# Altium PCB Smart-Switch-v1.1.PcbDoc (part 2 of 3)
Units mil, origin at the board's own origin, x right, y up, seen from the top; angles counter-clockwise.
Board outline 1456.69 x 1377.95 mil, 4 copper layers (Top Layer, Power Layer, Ground Layer, Bottom Layer), stack 39.334 mil thick; 77 components, 44 nets, 240 pads, 216 vias.
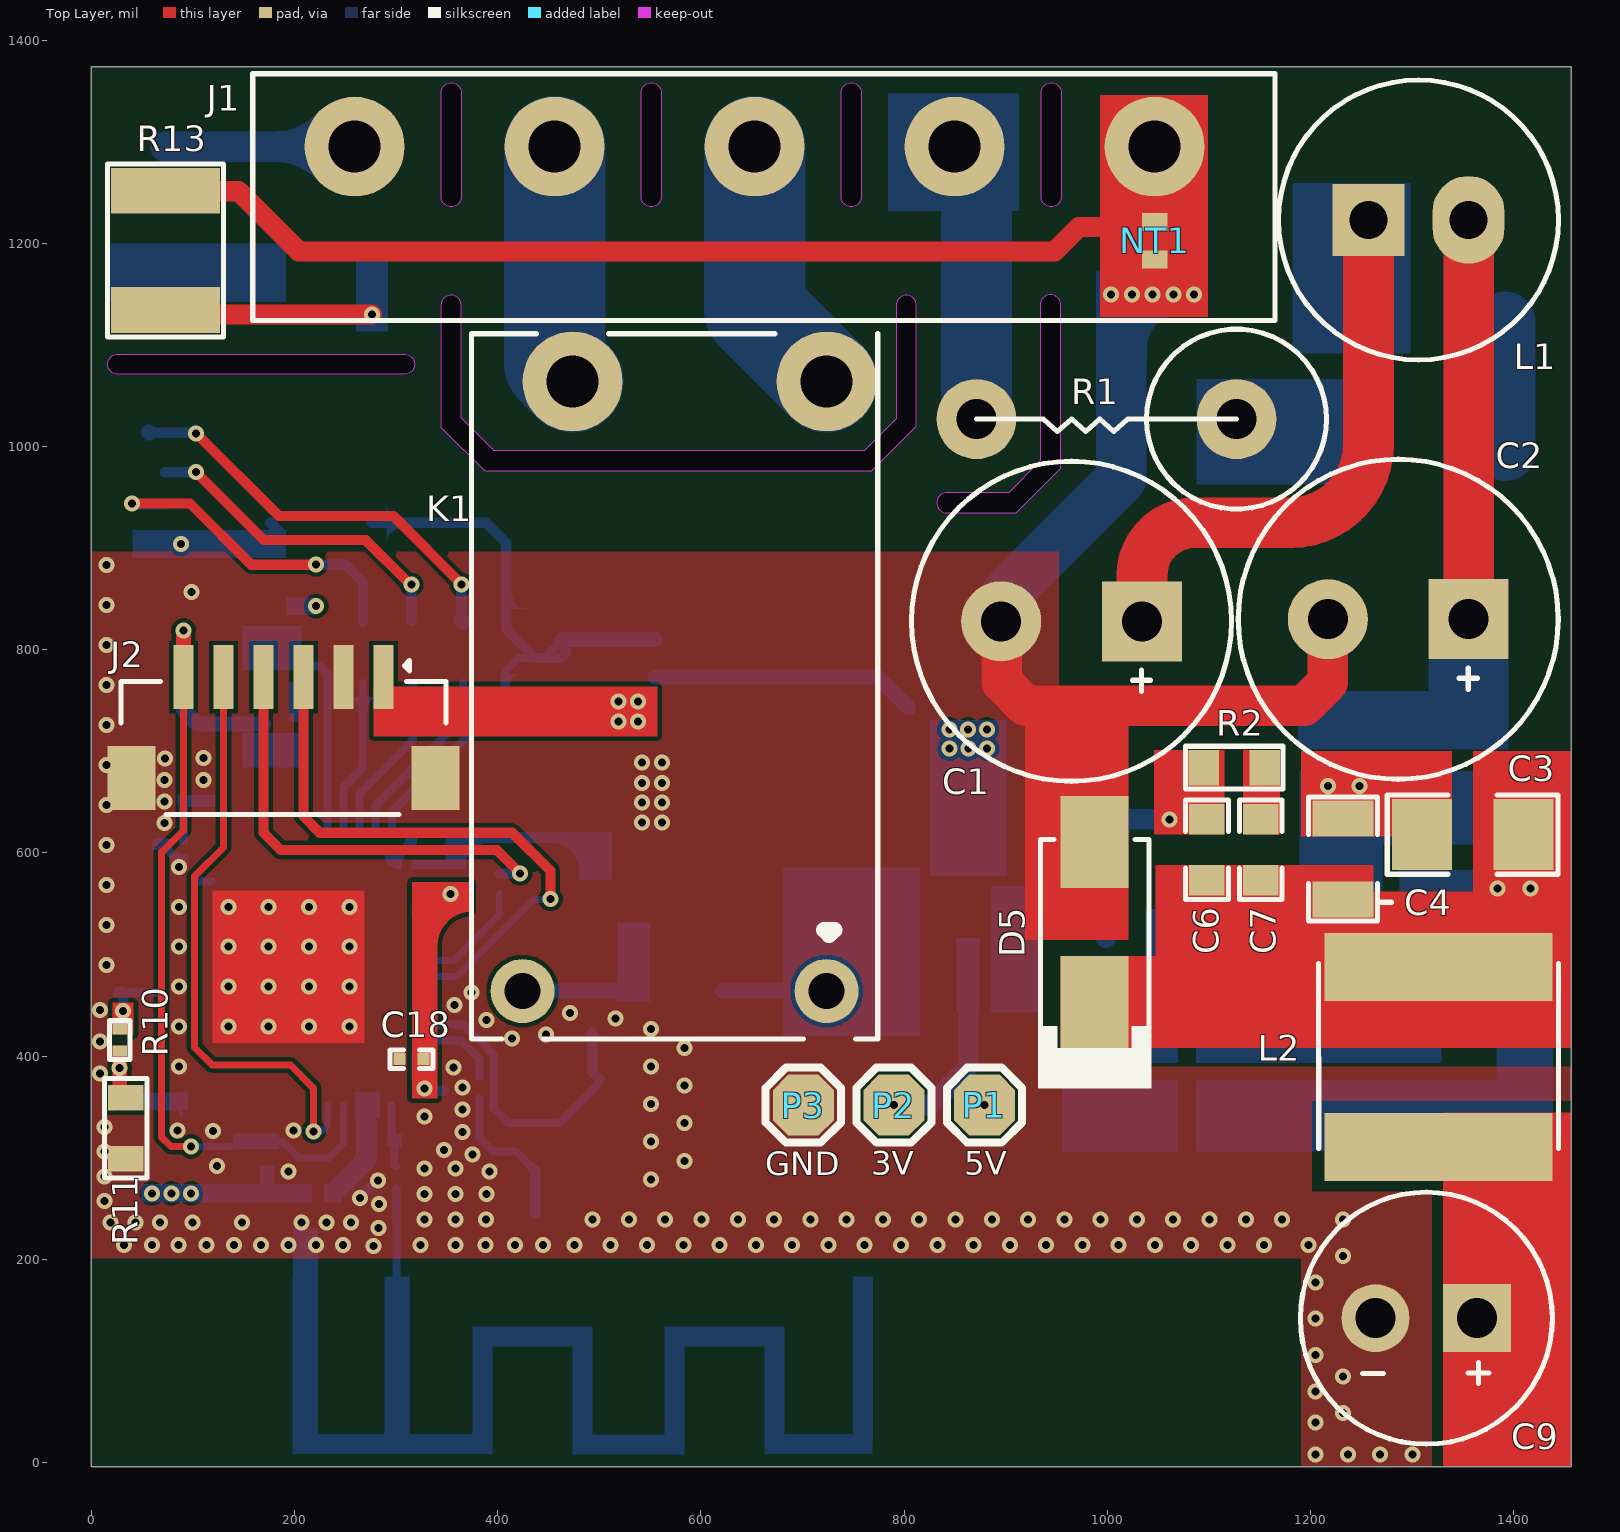
[diagram p0: Top Layer view]

## Part data (continued)
L3: library part MLG0603P2N0CT000, "FIXED IND 2NH 600MA 100 MOHM SMD", Case Code (Imperial)=0201, Case Code (Metric)=0603, Current Rating=600mA, DC Resistance (DCR)=100mR, LCSC Part Number=C531323, Manufacturer=TDK, Max Operating Temperature=125°C, Min Operating Temperature=-55°C, Package Quantity=15000, Self Resonant Frequency=8.5GHz, Supplier Part Number=445-172431-1-ND, Test Frequency=500MHz, Case/Package=0201, Category="Fixed Inductors", ComponentLink1Description=https://datasheet.ciiva.com/41860/inductor-commercial-high-frequency-mlg-qp-en-41860968.pdf?src-supplier=Digi-Key, ComponentLink1URL=https://datasheet.ciiva.com/41860/inductor-commercial-high-frequency-mlg-qp-en-41860968.pdf?src-supplier=Digi-Key, Core Material=Non-Magnetic, Height - Seated (Max)=0.013inch, Item Type=Inductor, Length=0.024inch, Manufacturer Part Number=MLG0603P2N0CT000, Mounting Technology="Surface Mount", Packaging="Cut Tape", Pricing="1=0.13, 10=0.118, 25=0.1, 50=0.0882, 100=0.0808, 250=0.07352, 500=0.06908, 1000=0.05292, 2500=0.04998 (USD)", RoHS=Yes, RoHS Compliant=Yes, Series=MLG-P, Shielding=Unshielded, Stock=23499, Supplier=Digi-Key, Width=0.012inch
L4: library part LQP03HQ1N6B02D, "FIXED IND 1.6NH 1A 50 MOHM SMD", Case Code (Imperial)=0201, Case Code (Metric)=0603, Current Rating=1A, DC Resistance (DCR)=50mR, LCSC Part Number=C237384, Manufacturer=Murata, Max Operating Temperature=125°C, Min Operating Temperature=-55°C, Self Resonant Frequency=10GHz, Supplier Part Number=490-13883-1-ND, Test Frequency=500MHz, Case/Package=0201, Category="Fixed Inductors", ComponentLink1Description=http://search.murata.co.jp/Ceramy/image/img/P02/JELF243C-0021.pdf?src-supplier=Digi-Key, ComponentLink1URL=http://search.murata.co.jp/Ceramy/image/img/P02/JELF243C-0021.pdf?src-supplier=Digi-Key, Core Material=Non-Magnetic, Item Type=Inductor, Manufacturer Part Number=LQP03HQ1N6B02D, Mounting Technology="Surface Mount", Packaging="Cut Tape", Pricing="1=0.16, 10=0.145, 25=0.1236, 50=0.109, 100=0.1, 250=0.09088, 500=0.08544, 1000=0.06545, 2500=0.06181 (USD)", RoHS=Yes, RoHS Compliant=Yes, Series=LQP03, Shielding=Unshielded, Stock=27606, Supplier=Digi-Key
L5: library part LQP03TN24NH02D, "140mA 24nH ±3% 2.3Ω 0201 Inductors (SMD) ROHS", Case Code (Imperial)=0201, Case Code (Metric)=0603, Current Rating=140mA, DC Resistance (DCR)=2.3R, LCSC Part Number=C206441, Manufacturer=Murata, Max Operating Temperature=125°C, Min Operating Temperature=-55°C, Package Quantity=15000, Self Resonant Frequency=2GHz, Supplier Part Number=490-13004-1-ND, Test Frequency=500MHz, Tolerance=3%, Case/Package=0201, Category="Fixed Inductors", ComponentLink1Description=https://datasheet.ciiva.com/29692/s0084e-29692461.pdf?src-supplier=Digi-Key, ComponentLink1URL=https://datasheet.ciiva.com/29692/s0084e-29692461.pdf?src-supplier=Digi-Key, Core Material=Non-Magnetic, DC Current=140mA, Depth=0.33mm, Height - Seated (Max)=0.013inch, Item Type=Inductor, Length=0.024inch, Manufacturer Part Number=LQP03TN24NH02D, Military Standard=Not, Mounting Technology="Surface Mount", Packaging="Tape and Reel", Pricing="1=0.1, 10=0.041, 25=0.0364, 50=0.031, 100=0.0273, 250=0.025, 500=0.02272, 1000=0.01909, 2500=0.01636 (USD)", RoHS=Yes, RoHS Compliant=Yes, Series=LQP03TN_02, Shielding=Unshielded, Stock=40849, Supplier=Digi-Key, Technology="THIN FILM", Width=0.012inch
LED1: "Colorless transparence Side stickers -40℃~+85℃ Common anode RGB 120° 60mW SMD,1.5x3.2mm Light Emitting Diodes (LED) ROHS", LCSC Part Number=C496820, Manufacturer=MEIHUA, Package=SMD,1.5x3.2mm, ComponentLink1Description=LCSC, ComponentLink1URL=https://www.lcsc.com/product-detail/Light-Emitting-Diodes-LED_MEIHUA-MHS110FRGBCT_C496820.html, Item Type="RGB LED", Manufacturer Part Number=MHS110FRGBCT
NT1: "Net Tie SMD", Manufacturer Part Number="Net Tie", Item Type="Net Tie Pad"
P1 P2 P3: "Test Point ON", Item Type="TEST POINT"
Q1: "MOSFET N-CH 130V 1A SOT23", LCSC Part Number=C156273, Manufacturer="Diodes Incorporated", Package=SOT-23-3L, ComponentLink1Description=LCSC, ComponentLink1URL=https://www.lcsc.com/product-detail/MOSFETs_Diodes-Incorporated-DMN13H750S-7_C156273.html, Item Type=Mosfet, Manufacturer Part Number=DMN13H750S-7
R1: library part "Vertical Resistor", "Metal Oxide Resistors 10Ω 2W ±350ppm/℃ ±5% Plugin Through Hole Resistors ROHS", LCSC Part Number=C601001, Manufacturer=VO, Manufacturer Part Number=MO2WS-10Ω±5%-6T63, Package=Plugin, ComponentLink1Description=LCSC, ComponentLink1URL=https://www.lcsc.com/product-detail/Through-Hole-Resistors_VO-MO2WS-10-5-6T63_C601001.html, Item Type="Through Hole Resistor"
R2: library part CRGCQ0603F220K, "RES 220K OHM 1% 1/10W 0603", LCSC Part Number=C4282892, Manufacturer="TE Connectivity", Power Rating=100mW, Supplier Part Number=73AC9080, Voltage Rating=75V, Category="Chip SMD Resistors", ComponentLink1Description=http://datasheet.octopart.com/CRGCQ0603F220K-TE-Connectivity-datasheet-114679081.pdf?src-supplier=Newark, ComponentLink1URL=http://datasheet.octopart.com/CRGCQ0603F220K-TE-Connectivity-datasheet-114679081.pdf?src-supplier=Newark, ComponentLink2Description=http://datasheet.octopart.com/CRGCQ0603F220K-TE-Connectivity-datasheet-114679081.pdf?src-supplier=Verical, ComponentLink2URL=http://datasheet.octopart.com/CRGCQ0603F220K-TE-Connectivity-datasheet-114679081.pdf?src-supplier=Verical, ComponentLink3Description=http://datasheet.octopart.com/CRGCQ0603F220K-TE-Connectivity-datasheet-114679081.pdf?src-supplier=Digi-Key, ComponentLink3URL=http://datasheet.octopart.com/CRGCQ0603F220K-TE-Connectivity-datasheet-114679081.pdf?src-supplier=Digi-Key, ComponentLink4Description=https://www.te.com/commerce/DocumentDelivery/DDEController?Action=srchrtrv&amp;DocNm=1773204-3&amp;DocType=DS&amp;DocLang=English&src-supplier=Digi-Key, ComponentLink4URL=https://www.te.com/commerce/DocumentDelivery/DDEController?Action=srchrtrv&amp;DocNm=1773204-3&amp;DocType=DS&amp;DocLang=English&src-supplier=Digi-Key, ComponentLink5Description=http://datasheet.octopart.com/CRGCQ0603F220K-TE-Connectivity-datasheet-114679081.pdf?src-supplier=Avnet, ComponentLink5URL=http://datasheet.octopart.com/CRGCQ0603F220K-TE-Connectivity-datasheet-114679081.pdf?src-supplier=Avnet, ComponentLink6Description=https://4donline.ihs.com/images/VipMasterIC/IC/TYEL/TYEL-S-A0004929575/TYEL-S-A0004929575-1.pdf?hkey=52A5661711E402568146F3353EA87419&src-supplier=Farnell, ComponentLink6URL=https://4donline.ihs.com/images/VipMasterIC/IC/TYEL/TYEL-S-A0004929575/TYEL-S-A0004929575-1.pdf?hkey=52A5661711E402568146F3353EA87419&src-supplier=Farnell, ComponentLink7Description=http://datasheet.octopart.com/CRGCQ0603F220K-TE-Connectivity-datasheet-114679081.pdf?src-supplier=Mouser, ComponentLink7URL=http://datasheet.octopart.com/CRGCQ0603F220K-TE-Connectivity-datasheet-114679081.pdf?src-supplier=Mouser, ComponentLink8Description=https://4donline.ihs.com/images/VipMasterIC/IC/TYEL/TYEL-S-A0004929575/TYEL-S-A0004929575-1.pdf?hkey=52A5661711E402568146F3353EA87419&src-supplier=Newark, ComponentLink8URL=https://4donline.ihs.com/images/VipMasterIC/IC/TYEL/TYEL-S-A0004929575/TYEL-S-A0004929575-1.pdf?hkey=52A5661711E402568146F3353EA87419&src-supplier=Newark, ComponentLink9Description=https://datasheet.octopart.com/5-2176339-3-TE-Connectivity-datasheet-167977702.pdf?src-supplier=Future+Electronics, ComponentLink9URL=https://datasheet.octopart.com/5-2176339-3-TE-Connectivity-datasheet-167977702.pdf?src-supplier=Future+Electronics, ComponentLink10Description=http://datasheet.octopart.com/CRGCQ0603F220K-TE-Connectivity-datasheet-114679081.pdf?src-supplier=Onlinecomponents.com, ComponentLink10URL=http://datasheet.octopart.com/CRGCQ0603F220K-TE-Connectivity-datasheet-114679081.pdf?src-supplier=Onlinecomponents.com, ComponentLink11Description=https://datasheet.octopart.com/CRGCQ0603F220K-TE-Connectivity-datasheet-114679081.pdf?src-supplier=Master+Electronics, ComponentLink11URL=https://datasheet.octopart.com/CRGCQ0603F220K-TE-Connectivity-datasheet-114679081.pdf?src-supplier=Master+Electronics, ComponentLink12Description=http://datasheet.octopart.com/CRGCQ0603F220K-TE-Connectivity-datasheet-114679081.pdf?src-supplier=TME, ComponentLink12URL=http://datasheet.octopart.com/CRGCQ0603F220K-TE-Connectivity-datasheet-114679081.pdf?src-supplier=TME, ComponentLink13Description=http://datasheet.octopart.com/CRGCQ0603F220K-TE-Connectivity-datasheet-114679081.pdf?src-supplier=Sager+Electronics, ComponentLink13URL=http://datasheet.octopart.com/CRGCQ0603F220K-TE-Connectivity-datasheet-114679081.pdf?src-supplier=Sager+Electronics, ComponentLink14Description=http://datasheet.octopart.com/CRGCQ0603F220K-TE-Connectivity-datasheet-114679081.pdf?src-supplier=Heilind+Electronics, ComponentLink14URL=http://datasheet.octopart.com/CRGCQ0603F220K-TE-Connectivity-datasheet-114679081.pdf?src-supplier=Heilind+Electronics, ComponentLink15Description=http://datasheet.octopart.com/CRGCQ0603F220K-TE-Connectivity-datasheet-114679081.pdf?src-supplier=Electro+Sonic, ComponentLink15URL=http://datasheet.octopart.com/CRGCQ0603F220K-TE-Connectivity-datasheet-114679081.pdf?src-supplier=Electro+Sonic, ComponentLink16Description=http://datasheet.octopart.com/CRGCQ0603F220K-TE-Connectivity-datasheet-114679081.pdf?src-supplier=Interstate+Connecting+Components, ComponentLink16URL=http://datasheet.octopart.com/CRGCQ0603F220K-TE-Connectivity-datasheet-114679081.pdf?src-supplier=Interstate+Connecting+Components, Height=550um, Item Type=Resistor, Manufacturer Part Number=CRGCQ0603F220K, Pricing="1=0.006 (USD)", RoHS=Yes, Stock=4740, Supplier=Avnet, Voltage Rating (DC)=75V
R3 R4: library part CRCW120622K0FKEAC, "RES 22K OHM 1% 1/4W 1206", LCSC Part Number=C1511874, Manufacturer=Vishay, Supplier Part Number=71-CRCW120622K0FKEAC, Category="Chip SMD Resistors", Item Type=Resistor, Manufacturer Part Number=CRCW120622K0FKEAC, Pricing="1=0.1, 10=0.036, 50=0.036, 100=0.016, 1000=0.011, 10000=0.007 (USD)", RoHS=Yes, RoHS Compliant=Yes, Stock=118020, Supplier=Mouser
R5: library part AC0603FR-0756KL, "RES SMD 56K OHM 1% 1/10W 0603", LCSC Part Number=C144647, Manufacturer=Yageo, Supplier Part Number=4073924, Category="Chip SMD Resistors", ComponentLink1Description=http://www.mouser.com/ds/2/447/yageodocoutput-1111992.pdf?src-supplier=Mouser, ComponentLink1URL=http://www.mouser.com/ds/2/447/yageodocoutput-1111992.pdf?src-supplier=Mouser, ComponentLink2Description=http://www.yageo.com/NewPortal/yageodocoutput?fileName=/pdf/R-Chip/PYu-AC_51_RoHS_L_6.pdf&src-supplier=Digi-Key, ComponentLink2URL=http://www.yageo.com/NewPortal/yageodocoutput?fileName=/pdf/R-Chip/PYu-AC_51_RoHS_L_6.pdf&src-supplier=Digi-Key, ComponentLink3Description=https://datasheet.octopart.com/AC0603FR-0756KL-Yageo-datasheet-151884373.pdf?src-supplier=Future+Electronics, ComponentLink3URL=https://datasheet.octopart.com/AC0603FR-0756KL-Yageo-datasheet-151884373.pdf?src-supplier=Future+Electronics, Item Type=Resistor, Manufacturer Part Number=AC0603FR-0756KL, Pricing="5000=0.0016, 25000=0.0015, 150000=0.0014, 500000=0.0014, 1500000=0.0013 (USD)", RoHS=Yes, Stock=100000, Supplier="Future Electronics"
R6: library part CRCW08055K60FKEA, "RES SMD 5.6K OHM 1% 1/8W 0805", Case Code (Imperial)=0805, Case Code (Metric)=2012, LCSC Part Number=C844634, Manufacturer=Vishay, Max Operating Temperature=155°C, Max Power Dissipation=125mW, Min Operating Temperature=-55°C, Package Quantity=5000, Ratings=AEC-Q200, Resistance Tolerance=1%, Resistor Type="Thick Film", Supplier Part Number=6791572P, Temperature Coefficient=100ppm/°C, Voltage Rating=150V, Case/Package=0805, Category="Chip SMD Resistors", ComponentLink1Description=https://datasheet.ciiva.com/11811/0900766b80d98b26-11811062.pdf?src-supplier=Rs, ComponentLink1URL=https://datasheet.ciiva.com/11811/0900766b80d98b26-11811062.pdf?src-supplier=Rs, ComponentLink2Description=https://datasheet.ciiva.com/2525/dcrcwe3-2525722.pdf?src-supplier=Digi-Key, ComponentLink2URL=https://datasheet.ciiva.com/2525/dcrcwe3-2525722.pdf?src-supplier=Digi-Key, ComponentLink3Description=https://datasheet.ciiva.com/16767/70201119-16767127.pdf?src-supplier=Allied+Electronics, ComponentLink3URL=https://datasheet.ciiva.com/16767/70201119-16767127.pdf?src-supplier=Allied+Electronics, ComponentLink4Description=https://datasheet.ciiva.com/7841/1697337-7841861.pdf?src-supplier=Element14, ComponentLink4URL=https://datasheet.ciiva.com/7841/1697337-7841861.pdf?src-supplier=Element14, ComponentLink5Description=https://datasheet.ciiva.com/26317/fld-crcw-e3-data-en-26317147.pdf?src-supplier=Distrelec, ComponentLink5URL=https://datasheet.ciiva.com/26317/fld-crcw-e3-data-en-26317147.pdf?src-supplier=Distrelec, ComponentLink6Description=https://datasheet.ciiva.com/7841/1697337-7841690.pdf?src-supplier=Element14, ComponentLink6URL=https://datasheet.ciiva.com/7841/1697337-7841690.pdf?src-supplier=Element14, ComponentLink7Description=https://datasheet.ciiva.com/22683/1847332-22683327.pdf?src-supplier=Element14, ComponentLink7URL=https://datasheet.ciiva.com/22683/1847332-22683327.pdf?src-supplier=Element14, ComponentLink8Description=https://datasheet.ciiva.com/2525/dcrcwe3-2525723.pdf?src-supplier=Digi-Key, ComponentLink8URL=https://datasheet.ciiva.com/2525/dcrcwe3-2525723.pdf?src-supplier=Digi-Key, ComponentLink9Description=https://datasheet.ciiva.com/2525/dcrcwe3-2525724.pdf?src-supplier=Digi-Key, ComponentLink9URL=https://datasheet.ciiva.com/2525/dcrcwe3-2525724.pdf?src-supplier=Digi-Key, ComponentLink10Description=https://datasheet.ciiva.com/9065/dcrcwe3-9065422.pdf?src-supplier=Avnet, ComponentLink10URL=https://datasheet.ciiva.com/9065/dcrcwe3-9065422.pdf?src-supplier=Avnet, Contact Plating=Tin, Depth=1.25mm, Features="Automotive AEC-Q200", Height=0.45mm, Item Type=Resistor, Length=2mm, Manufacturer Part Number=CRCW08055K60FKEA, Number of Terminations=2, Packaging="Tape and Reel", Pins=2, Power Rating=125mW, Pricing="1250=0.024, 2500=0.013, 4000=0.015, 5000=0.011 (GBP)", Reach SVHC Compliant=Unknown, RoHS=Yes, RoHS Compliant=Yes, Series=CRCW, Stock=100250, Supplier=Rs, Technology="THICK FILM", Termination=SMD/SMT, Tolerance=1%, Voltage Rating (DC)=150V, Weight=0.000194oz, Width=1.25mm
R7 R10 R14 R15: library part RC0201FR-0710KL, "RES SMD 10K OHM 1% 1/20W 0201", LCSC Part Number=C106225, Manufacturer=Yageo, Package=0201, ComponentLink7Description=LCSC, ComponentLink7URL=https://www.lcsc.com/product-detail/Chip-Resistor-Surface-Mount_YAGEO-RC0201FR-0710KL_C106225.html, Item Type=Resistor, Manufacturer Part Number=RC0201FR-0710KL
R8: library part RC0201FR-07499RL, "RES 499 OHM 1% 1/20W 0201", Case Code (Imperial)=0201, Case Code (Metric)=0603, LCSC Part Number=C138137, Manufacturer=Yageo, Max Operating Temperature=125°C, Max Power Dissipation=50mW, Min Operating Temperature=-55°C, Resistor Type="Thick Film", Temperature Coefficient=200ppm/°C, Tolerance=1%, Case/Package=0201, Category="Chip SMD Resistors", ComponentLink1Description=http://www.yageo.com/documents/recent/PYu-RC_Group_51_RoHS_L_10.pdf?src-supplier=Digi-Key, ComponentLink1URL=http://www.yageo.com/documents/recent/PYu-RC_Group_51_RoHS_L_10.pdf?src-supplier=Digi-Key, ComponentLink2Description=http://www.yageo.com/documents/recent/PYu-RC_Group_51_RoHS_L_9.pdf?src-supplier=Digi-Key, ComponentLink2URL=http://www.yageo.com/documents/recent/PYu-RC_Group_51_RoHS_L_9.pdf?src-supplier=Digi-Key, Depth=0.3mm, Features="Moisture Resistant", Height=0.01inch, Item Type=Resistor, Lead Free="Lead Free", Length=0.024inch, Manufacturer Part Number=RC0201FR-07499RL, Military Standard=Not, Number of Terminations=2, Packaging="Tape and Reel", Pricing 1="10000=0.00128 (USD)", Resistance=499R, RoHS=Yes, RoHS Compliant=Yes, Stock 1=150000, Supplier 1=Avnet, Supplier Part Number 1=RC0201FR-07499RL, Width=0.012inch
R9: library part RC0402FR-071KL, "RES 1K OHM 1% 1/16W 0402", Case Code (Imperial)=0402, Case Code (Metric)=1005, LCSC Part Number=C106235, Manufacturer=Yageo, Max Operating Temperature=155°C, Max Power Dissipation=63mW, Min Operating Temperature=-55°C, Power Rating=62.5mW, Resistance=1kR, Resistance Tolerance=1%, Resistor Type="Thick Film", Temperature Coefficient=100ppm/°C, Voltage Rating=50V, Case/Package=0402, Category="Chip SMD Resistors", ComponentLink1Description=https://datasheet.ciiva.com/11819/0900766b80c66297-11819477.pdf?src-supplier=RSComponents, ComponentLink1URL=https://datasheet.ciiva.com/11819/0900766b80c66297-11819477.pdf?src-supplier=RSComponents, ComponentLink2Description=https://datasheet.ciiva.com/7983/1018594-7983502.pdf?src-supplier=Element14, ComponentLink2URL=https://datasheet.ciiva.com/7983/1018594-7983502.pdf?src-supplier=Element14, ComponentLink3Description=https://datasheet.ciiva.com/22747/1018594-22747513.pdf?src-supplier=Element14, ComponentLink3URL=https://datasheet.ciiva.com/22747/1018594-22747513.pdf?src-supplier=Element14, ComponentLink4Description=https://datasheet.ciiva.com/12666/pyu-rc0402-51-rohs-l-6-r-12666741.pdf?src-supplier=Mouser, ComponentLink4URL=https://datasheet.ciiva.com/12666/pyu-rc0402-51-rohs-l-6-r-12666741.pdf?src-supplier=Mouser, ComponentLink5Description=https://datasheet.ciiva.com/7849/1018594-7849869.pdf?src-supplier=Element14, ComponentLink5URL=https://datasheet.ciiva.com/7849/1018594-7849869.pdf?src-supplier=Element14, ComponentLink6Description=https://datasheet.ciiva.com/7849/1018594-7849871.pdf?src-supplier=Element14, ComponentLink6URL=https://datasheet.ciiva.com/7849/1018594-7849871.pdf?src-supplier=Element14, ComponentLink7Description=https://datasheet.ciiva.com/17063/pyu-rc0402-51-rohs-l-6-r-17063193.pdf?src-supplier=Future+Electronics, ComponentLink7URL=https://datasheet.ciiva.com/17063/pyu-rc0402-51-rohs-l-6-r-17063193.pdf?src-supplier=Future+Electronics, Construction=Rectangular, Depth=0.5mm, Features="Moisture Resistant", Height=0.32mm, Item Type=Resistor, Lead Free="Lead Free", Length=1mm, Manufacturer Part Number=RC0402FR-071KL, Military Standard=Not, Number of Pins=2, Number of Terminations=2, Packaging="Tape and Reel", Pricing 1="10000=0.00085, 20000=0.00087, 40000=0.00084, 60000=0.00083, 80000=0.00079, 100000=0.00078, 1000000=0.00076 (USD)", Reach SVHC Compliant=Yes, RoHS=Yes, RoHS Compliant=Yes, Series=RC, Size Code=0402, Stock 1=13030000, Supplier 1=Avnet, Supplier Part Number 1=RC0402FR-071KL, Technology="THICK FILM", Termination=SMD/SMT, Tolerance=1%, Voltage Rating (DC)=50V, Width=0.5mm
R11: library part B57332V5103F360, "THERMISTOR NTC 10KOHM 3380K 0603", Case Code (Imperial)=0603, Case Code (Metric)=1608, LCSC Part Number=C209893, Manufacturer="TDK EPCOS", Max Operating Temperature=150°C, Max Power Dissipation=180mW, Min Operating Temperature=-40°C, Package Quantity=4000, Resistance Tolerance=1%, Supplier Part Number=8807288P, Case/Package=0603, Category=Thermistors, ComponentLink1Description=https://datasheet.ciiva.com/26930/getdatasheetpartid-777571-26930642.pdf?src-supplier=Verical, ComponentLink1URL=https://datasheet.ciiva.com/26930/getdatasheetpartid-777571-26930642.pdf?src-supplier=Verical, ComponentLink2Description=https://datasheet.ciiva.com/46435/1835850-46435735.pdf?src-supplier=Element14, ComponentLink2URL=https://datasheet.ciiva.com/46435/1835850-46435735.pdf?src-supplier=Element14, Contact Plating=Tin, Depth=0.8mm, Height=0.9mm, Item Type="NTC Thermistor", Length=1.6mm, Manufacturer Part Number=B57332V5103F360, Mounting Technology="Surface Mount", Packaging="Tape and Reel", Pins=2, Power Rating=180mW, Pricing="250=0.085 (GBP)", Radiation Hardening=No, Reach SVHC Compliant=No, RoHS=Yes, RoHS Compliant=Yes, Series=B573, Stock=178550, Supplier=Rs, Termination=SMD/SMT, Tolerance=1%, Width=0.8mm
R12 R13: library part CR1210J30204G, "750mW Thick Film Resistors ±5% ±200ppm/℃ 200kΩ 1210 Chip Resistor - Surface Mount ROHS", LCSC Part Number=C102430, Manufacturer="LIZ Elec", Package=1210, ComponentLink1Description=LCSC, ComponentLink1URL=https://www.lcsc.com/product-detail/Chip-Resistor-Surface-Mount_LIZ-Elec-CR1210J30204G_C102430.html, Item Type=Resistor, Manufacturer Part Number=CR1210J30204G
R16: library part RT0603BRD07240RL, "RES SMD 240 OHM 0.1% 1/10W 0603", Case Code (Imperial)=0603, Case Code (Metric)=1608, LCSC Part Number=C705750, Manufacturer=Yageo, Max Operating Temperature=125°C, Max Power Dissipation=100mW, Min Operating Temperature=-55°C, Resistor Type="Thin Film", Temperature Coefficient=25ppm/°C, Tolerance=0.1%, Voltage Rating=75V, Voltage Rating (DC)=50V, Case/Package=0603, Category="Chip SMD Resistors", ComponentLink1Description=https://datasheet.ciiva.com/8886/pyu-rt-1-to-0-05-rohs-l-4-8886602.pdf?src-supplier=Avnet, ComponentLink1URL=https://datasheet.ciiva.com/8886/pyu-rt-1-to-0-05-rohs-l-4-8886602.pdf?src-supplier=Avnet, ComponentLink2Description=https://datasheet.ciiva.com/12799/pyu-rt-1-to-0-05-rohs-l-4-12799039.pdf?src-supplier=Mouser, ComponentLink2URL=https://datasheet.ciiva.com/12799/pyu-rt-1-to-0-05-rohs-l-4-12799039.pdf?src-supplier=Mouser, Construction=Rectangular, Contact Plating=Tin,Matte, Depth=0.8mm, Features="Moisture Resistant", Height=0.022inch, Lead Free="Lead Free", Length=1.6mm, Manufacturer Part Number=RT0603BRD07240RL, Military Standard=Not, Number of Terminations=2, Packaging="Tape and Reel", Power Rating=100mW, Pricing 1="1=0.13940 (USD)", Radiation Hardening=No, Resistance=240R, RoHS=Yes, RoHS Compliant=Yes, Series=RT, Stock 1=5, Supplier 1="Arrow Electronics", Supplier Part Number 1=RT0603BRD07240RL, Termination=SMD/SMT, Width=0.031inch
R17 R18: library part RCA0603100RFKEAHP, "RES SMD 100 OHM 1% 1/4W 0603", Case Code (Imperial)=0603, Case Code (Metric)=1608, LCSC Part Number=C2074203, Manufacturer="Vishay Dale", Max Operating Temperature=155°C, Max Power Dissipation=250mW, Min Operating Temperature=-55°C, Resistor Type="Thick Film", Supplier Part Number 1=541-3244-2-ND, Temperature Coefficient=100ppm/°C, Tolerance=1%, Case/Package=0603, ComponentLink1Description=http://www.vishay.com/docs/20067/rcahp.pdf?src-supplier=Digi-Key, ComponentLink1URL=http://www.vishay.com/docs/20067/rcahp.pdf?src-supplier=Digi-Key, Features="Automotive AEC-Q200,Anti-Sulfur", Manufacturer Part Number=RCA0603100RFKEAHP, Number of Terminations=2, Packaging="Tape and Reel", Resistance=100R, RoHS Compliant=Yes, Stock 1=0, Supplier 1=Digi-Key
SW1 SW2: "SWITCH TACTILE SPST-NO 0.05A 12V", Contact Current Rating=50mA, Contact Resistance=100mR, Insulation Resistance=100MR, LCSC Part Number=C231329, Manufacturer=Omron, Max Operating Temperature=70°C, Max Voltage Rating (DC)=12V, Min Operating Temperature=-25°C, Operating Force=1.5N, Package Quantity=1, Ratings="Dust Proof,IP40", Supplier Part Number 1=SW1020DKR-ND, Actuator Length=0.4mm, Actuator Type=Standard, ComponentLink1Description=http://www.farnell.com/datasheets/60838.pdf?src-supplier=Farnell, ComponentLink1URL=http://www.farnell.com/datasheets/60838.pdf?src-supplier=Farnell, ComponentLink2Description=http://www.farnell.com/datasheets/60838.pdf?src-supplier=Element14, ComponentLink2URL=http://www.farnell.com/datasheets/60838.pdf?src-supplier=Element14, ComponentLink3Description=https://omronfs.omron.com/en_US/ecb/products/pdf/en-b3u.pdf?src-supplier=Digi-Key, ComponentLink3URL=https://omronfs.omron.com/en_US/ecb/products/pdf/en-b3u.pdf?src-supplier=Digi-Key, ComponentLink4Description=http://www.omron.com/ecb/products/pdf/en-b3u.pdf?src-supplier=Digi-Key, ComponentLink4URL=http://www.omron.com/ecb/products/pdf/en-b3u.pdf?src-supplier=Digi-Key, ComponentLink5Description=https://www.distrelec.biz/Web/Downloads/he/et/B3U_eng_datasheet.pdf?mime=application%2Fpdf&src-supplier=Distrelec, ComponentLink5URL=https://www.distrelec.biz/Web/Downloads/he/et/B3U_eng_datasheet.pdf?mime=application%2Fpdf&src-supplier=Distrelec, ComponentLink6Description=http://www.onlinecomponents.com/productFiles/mf-OM/en-b3u.pdf?src-supplier=Onlinecomponents.com, ComponentLink6URL=http://www.onlinecomponents.com/productFiles/mf-OM/en-b3u.pdf?src-supplier=Onlinecomponents.com, ComponentLink7Description=https://www.verical.com/server-webapp/html/getDatasheet?partID=552554&src-supplier=Verical, ComponentLink7URL=https://www.verical.com/server-webapp/html/getDatasheet?partID=552554&src-supplier=Verical, ComponentLink8Description=http://www.farnell.com/datasheets/1685550.pdf?src-supplier=Element14, ComponentLink8URL=http://www.farnell.com/datasheets/1685550.pdf?src-supplier=Element14, ComponentLink9Description=http://www.farnell.com/datasheets/2610940.pdf?src-supplier=Farnell, ComponentLink9URL=http://www.farnell.com/datasheets/2610940.pdf?src-supplier=Farnell, ComponentLink10Description=https://www.alliedelec.com/m/d/4c8a9ef82804fc3c241a13c1e298fd73.pdf?src-supplier=Allied+Electronics, ComponentLink10URL=https://www.alliedelec.com/m/d/4c8a9ef82804fc3c241a13c1e298fd73.pdf?src-supplier=Allied+Electronics, Contact Material=Silver, Current Rating=50mA, Depth=2.5mm, Electrical Life=200000Cycles, Height=1.2mm, Illumination Type=Non-Illuminated,Illuminated, Item Type=Switch, Lead Free="Lead Free", Length=4mm, Manufacturer Part Number=B3U-1000P, Max Current Rating=50mA, Mechanical Life=200000Cycles, Mount="Surface Mount", Orientation=Straight, Packaging="Tape and Reel", Pricing 1="1=1, 10=0.961, 25=0.9064, 50=0.7976, 100=0.7251, 250=0.68888, 500=0.67074, 1000=0.52571 (USD)", REACH SVHC=Unknown, Stock 1=116454, Supplier 1=Digi-Key, Switch Function=Off-Mom, Switch Travel=0.15mm, Termination=SMD/SMT, Throw Configuration=SPST, Voltage Rating (DC)=12V, Weight=0.000776oz, Width=3mm
U1: "AC to DC Switching Converter Boost/Buck/Flyback 4.25V 145kHz T/R 16-Pin SO N", LCSC Part Number=C3094036, Manufacturer=STMicroelectronics, Supplier Part Number=497-VIPER319LDCT-ND, Category="Voltage Regulators - Switching", Item Type=IC, Manufacturer Part Number=VIPER319LDTR, Pricing="1=1.65, 10=1.471, 25=1.3964, 100=1.1471, 250=1.07228, 500=0.9476, 1000=0.74811 (USD)", RoHS=No, Supplier=Digi-Key
U2: "75dB@(120Hz) 1A Fixed 3.3V~3.3V Positive 15V SOT-89-3 Linear Voltage Regulators (LDO) ROHS", LCSC Part Number=C81768, Manufacturer=UTC, Package=SOT-89-3, ComponentLink1Description=LCSC, ComponentLink1URL=https://www.lcsc.com/product-detail/Linear-Voltage-Regulators-LDO_UTC-Unisonic-Tech-LD1117AG-33-AB3-A-R_C81768.html, Item Type=IC, Manufacturer Part Number=LD1117AG-33-AB3-A-R
U4: "21dBm ESP32-S3R8 2.4GHz SMD WiFi Modules ROHS", LCSC Part Number=C3013940, Manufacturer="Espressif Systems", Supplier Part Number=356-ESP32-S3FH4R2, ComponentLink1Description=LCSC, ComponentLink1URL=https://www.lcsc.com/product-detail/WiFi-Modules_Espressif-Systems-ESP32-S3FH4R2_C3013940.html, Item Type=IC, Manufacturer Part Number=ESP32-S3FH4R2, Pricing="1=2.32, 10=2.32, 50=2.32, 100=2.32, 1000=2.32, 10000=2.32 (USD)", RoHS=No, Stock=2650, Supplier=Mouser
U5: "Optocoupler, Transistor, 3.75Kv, Sop-4 Rohs Compliant: Yes", Case/Package=SOP, Collector Emitter Saturation Voltage=300mV, Collector Emitter Voltage (VCEO)=40V, Current Transfer Ratio=300%, Forward Current=50mA, Forward Voltage=1.4V, Isolation Voltage=3.75kV, LCSC Part Number=C367377, Manufacturer=Renesas, Max Collector Current=80mA, Max Operating Temperature=100°C, Max Power Dissipation=150mW, Min Operating Temperature=-55°C, Supplier Part Number 1=559-1030-1-ND, Category=Optocouplers, ComponentLink1Description=https://datasheet.ciiva.com/15119/getdatasheetpartid-627104-15119353.pdf?src-supplier=Verical, ComponentLink1URL=https://datasheet.ciiva.com/15119/getdatasheetpartid-627104-15119353.pdf?src-supplier=Verical, Input Type=AC, Item Type=Optocoupler, Lead Free="Lead Free", Manufacturer Part Number=PS2705-1-F3-A, Max Input Current=50mA, Mount="Surface Mount", Number of Channels=1, Number of Circuits=1, Number of Elements=1, Number of Pins=4, Output Voltage=40V, Packaging="Tape and Reel", Power Dissipation=150mW, Pricing 1="1=0.99000, 10=0.64600, 100=0.42290, 1000=0.35070 (USD)", Radiation Hardening=No, Rise Time=3us, RoHS=Yes, RoHS Compliant=Yes, Stock 1=58368, Supplier 1=Digi-Key
X1: library part X322540MPB4SI, "40MHz SMD Crystal Resonator 15pF SMD3225-4P Crystals ROHS", LCSC Part Number=C9010, Manufacturer="Yangxing Tech", ComponentLink1Description=LCSC, ComponentLink1URL=https://www.lcsc.com/product-detail/Crystals_Yangxing-Tech-X322540MPB4SI_C9010.html, Item Type=Crystal, Manufacturer Part Number=X322540MPB4SI

## Via types
v1: diameter 15.75, hole 7.87, Top Layer to Bottom Layer, tented both sides, 216 vias